# Altium PCB pwm-controller-board.PcbDoc
Units mm, origin at the board's own origin, x right, y up, seen from the top; angles counter-clockwise.
Board outline 100 x 70 mm, 2 copper layers (Top Layer, Bottom Layer), stack 1.518 mm thick; 85 components, 66 nets, 252 pads, 265 vias.
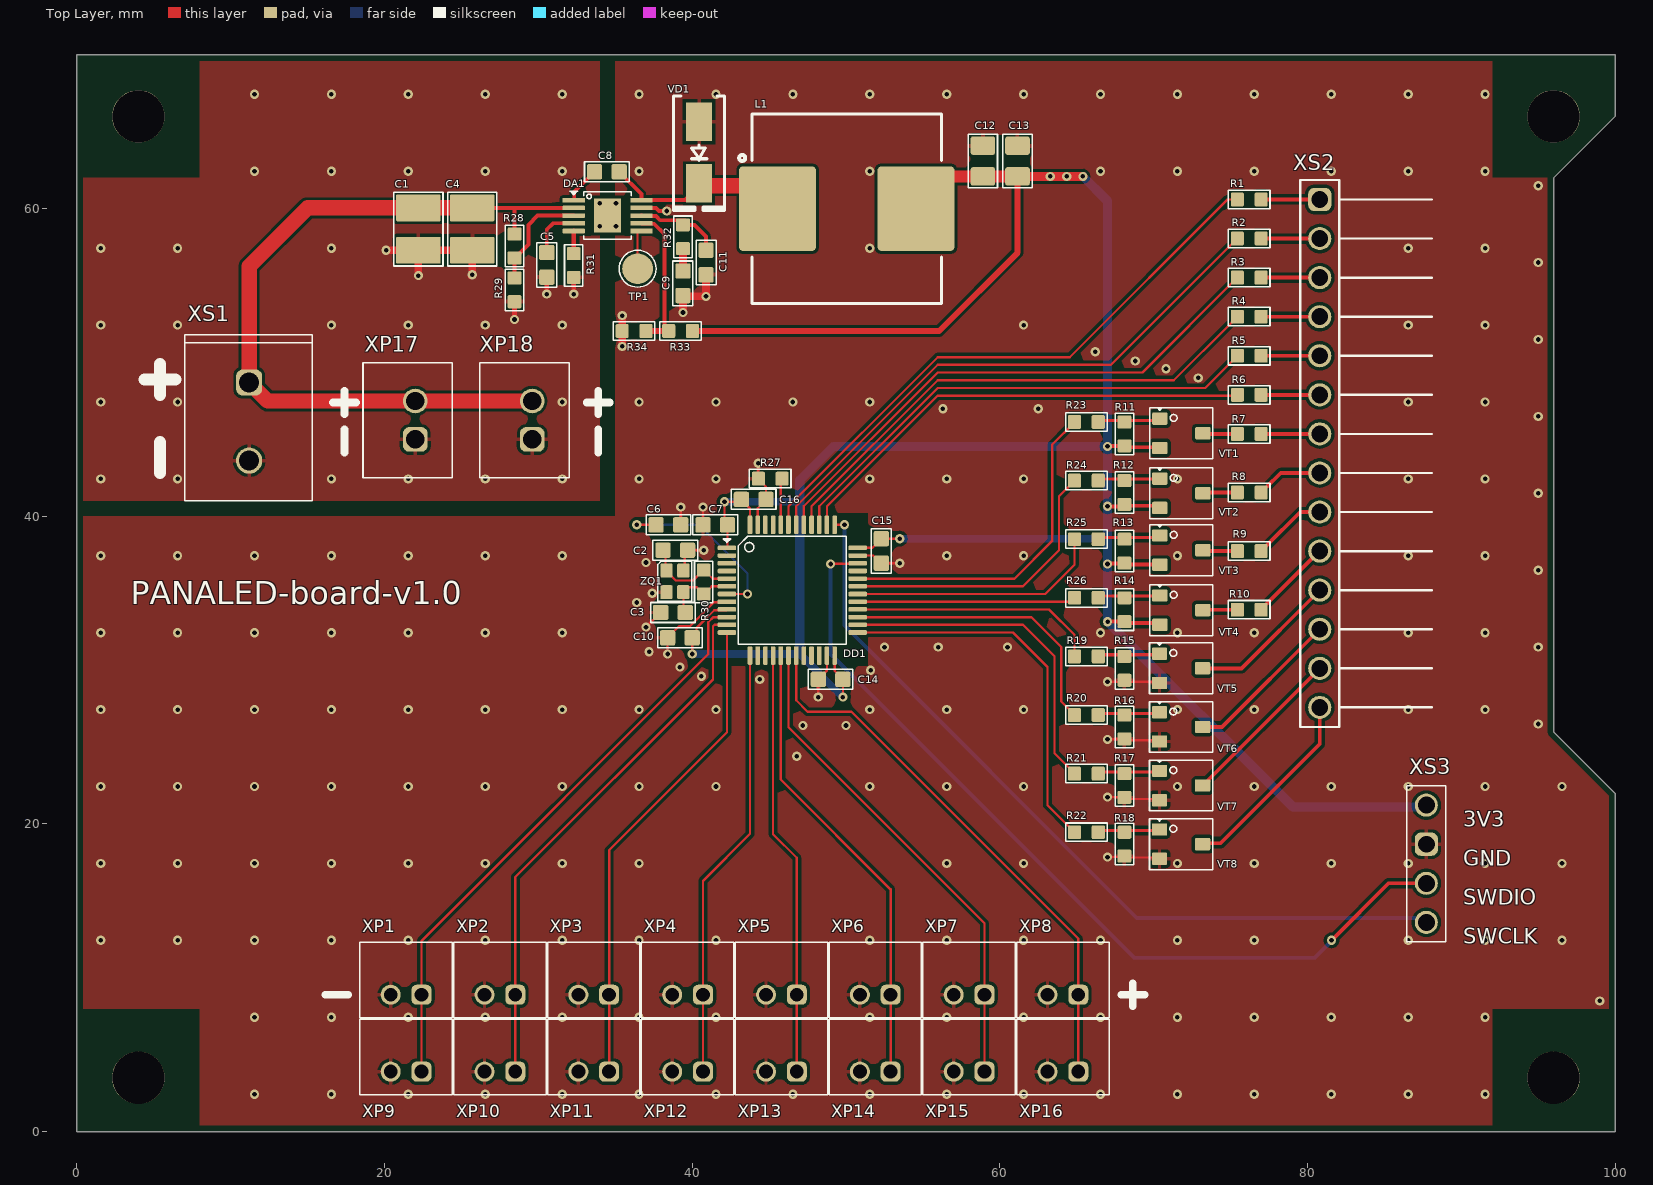
[diagram p0: Top Layer view]
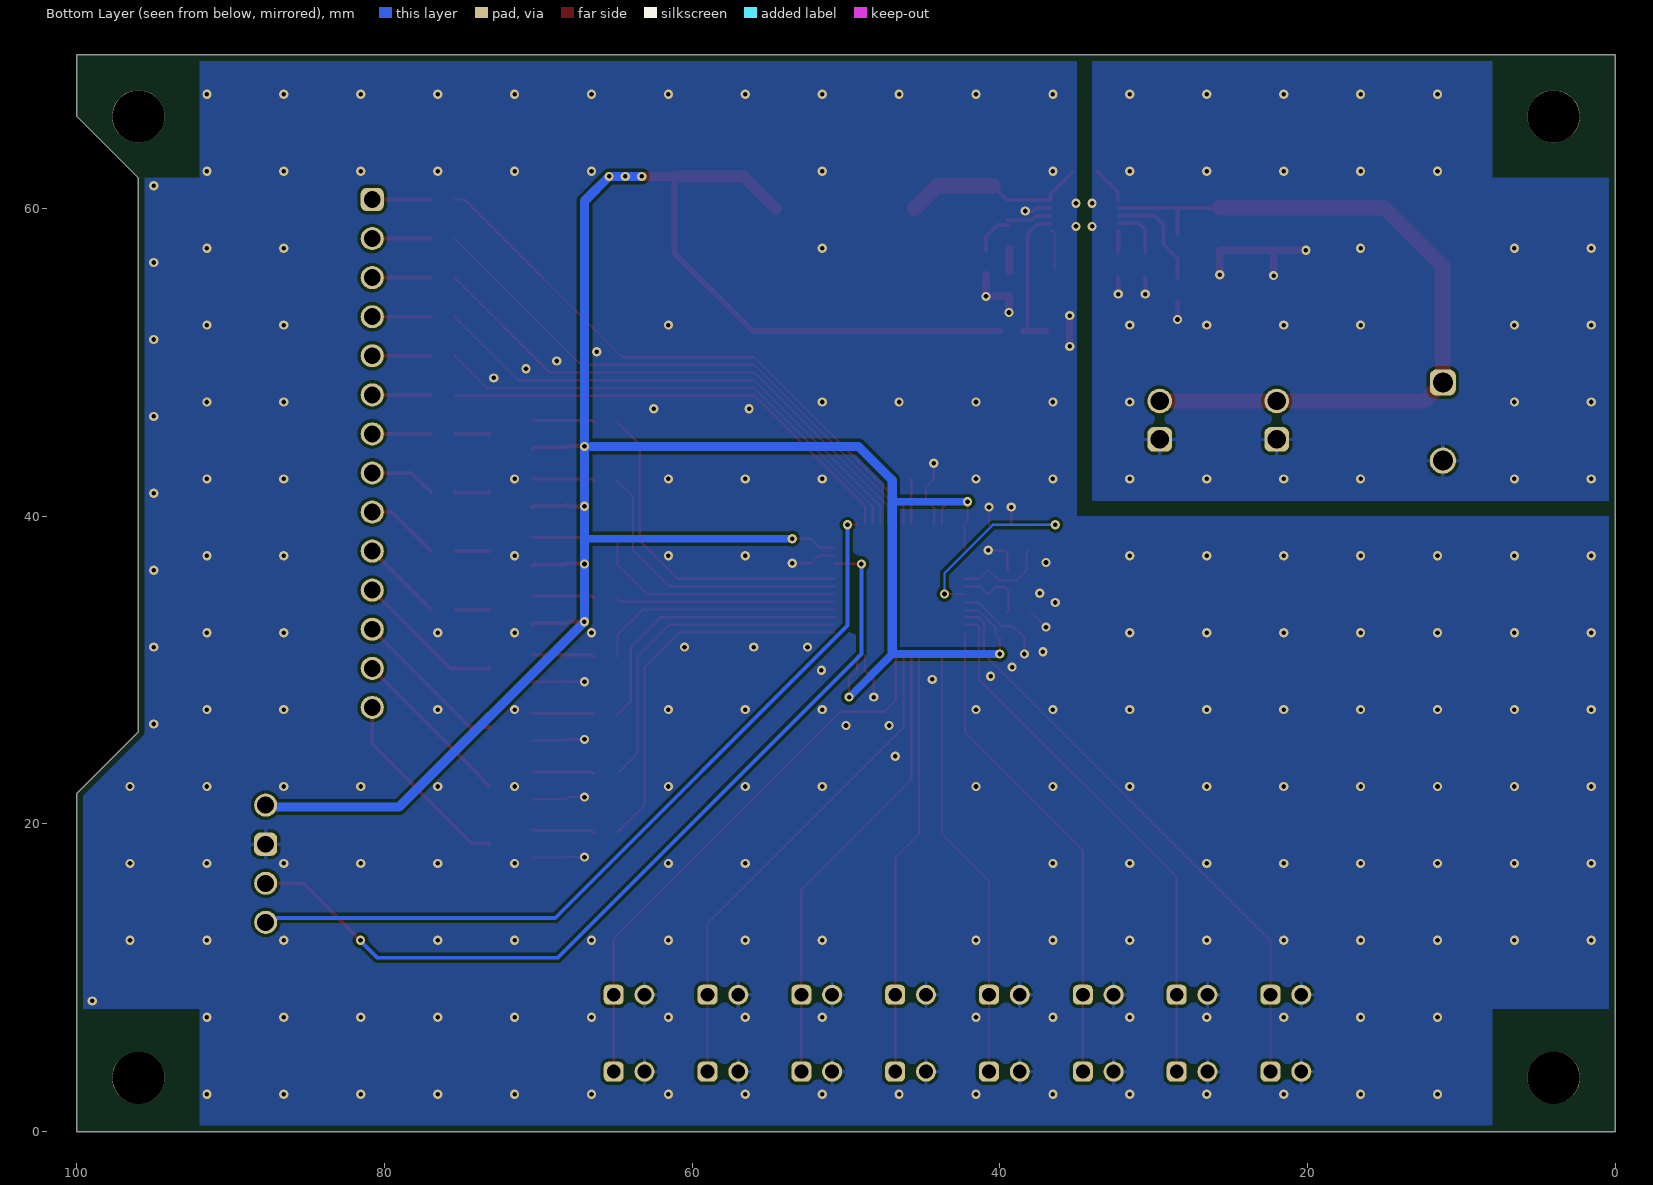
[diagram p1: Bottom Layer view, seen from below]
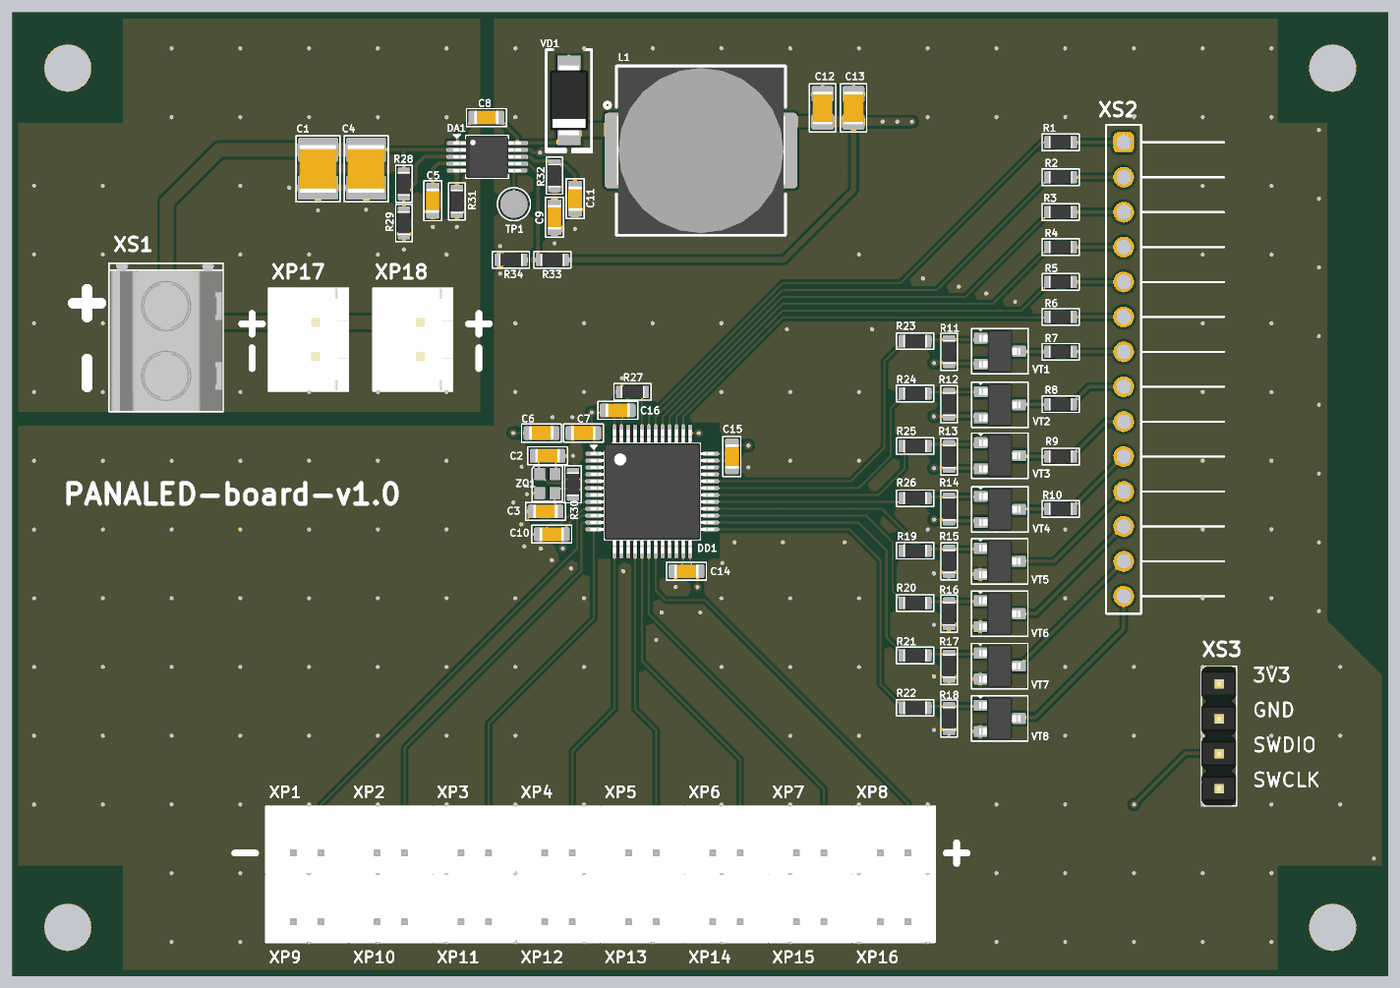
[diagram p2: 3D render of the assembled board from above, using the file's embedded part models]

## Layer stack, top to bottom
Top Solder: solder mask 0.0254, SM-001, Dk 4
Top Layer: signal copper 0.018
Dielectric 1: core 1.482, FR4 Tg135, Dk 4.5
Bottom Layer: signal copper 0.018
Bottom Solder: solder mask 0.0254, SM-001, Dk 4

## Board outline
0,0 0,70 100,70 100,66 96,62 96,26 100,22 100,0

## Design rules (kind name [scope] priority, off if disabled: settings)
AcuteAngle [All] p1: minimum=3.50000000000000E+0001 checktracksonly=FALSE
BoardOutlineClearance "BoardOutlineClearance 1" [All] p1 off: gap=0.25 ignorepadtopadclearanceinfootprint=FALSE except(0: Arc-SplitContinuation Track-SplitContinuation SMDPad-SplitContinuation THPad-SplitContinuation Via-SplitContinuation Fill-SplitContinuation Poly-SplitContinuation Region-SplitContinuation Text-SplitContinuation) // Milling
BoardOutlineClearance "BoardOutlineClearance 2" [All] p2: gap=0.4 ignorepadtopadclearanceinfootprint=FALSE except(0: Arc-SplitContinuation Track-SplitContinuation SMDPad-SplitContinuation THPad-SplitContinuation Via-SplitContinuation Fill-SplitContinuation Poly-SplitContinuation Region-SplitContinuation Text-SplitContinuation) // V-Cut
Clearance "Clearance-1 1/2 Oz" [All] p1: gap=0.125 ignorepadtopadclearanceinfootprint=FALSE except(0.2: Arc-Fill Arc-Poly Track-Fill Track-Poly SMDPad-SMDPad SMDPad-Fill SMDPad-Poly THPad-Fill THPad-Poly Via-Fill Via-Poly Fill-Fill Fill-Poly Poly-Poly Poly-Region Poly-Text; 0.25: Arc-Hole Track-Hole SMDPad-Hole THPad-Hole Via-Hole Fill-Hole Poly-Hole Region-Hole Text-Hole) // Standart
Clearance "Clearance-2 1/2 Oz" [All] p2 off: gap=0.1 ignorepadtopadclearanceinfootprint=FALSE except(0.15: Arc-Fill Arc-Poly Track-Fill Track-Poly SMDPad-SMDPad SMDPad-Fill SMDPad-Poly THPad-Fill THPad-Poly Via-Fill Via-Poly Fill-Fill Fill-Poly Poly-Poly Poly-Region Poly-Text; 0.25: Arc-Hole Track-Hole SMDPad-Hole THPad-Hole Via-Hole Fill-Hole Poly-Hole Region-Hole Text-Hole) // Advance
ComponentClearance [All] p1: gap=0.1 collisioncheckmode=3 verticalgap=0.1 showdistances=FALSE
DiffPairsRouting "DiffPairsRouting 1/2 Oz" [All] p1: maxlimit=0.254 minlimit=0.1 mostfreqgap=0.254 toplayer_minwidth=0.1 toplayer_maxwidth=0.381 toplayer_prefwidth=0.381 bottomlayer_minwidth=0.1 bottomlayer_maxwidth=0.381 bottomlayer_prefwidth=0.381 maxuncoupledlength=12.7
HoleSize "Minimum HoleSize" [IsPad] p1: absolutevalues=TRUE maxlimit=5.9 minlimit=0.6 maxpercent=80.000 minpercent=20.000
HoleSize "Minimum HoleSize VIA 1" [IsVia] p2: absolutevalues=TRUE maxlimit=5.9 minlimit=0.3 maxpercent=80.000 minpercent=20.000 // Standart
HoleSize "Minimum HoleSize VIA 2" [IsVia] p3 off: absolutevalues=TRUE maxlimit=5.9 minlimit=0.2 maxpercent=80.000 minpercent=20.000 // Advance
HoleToHoleClearance Hole2HoleClearance [All] p1: gap=0.25 allowstackedmicrovias=FALSE
MinimumAnnularRing "Minimum AR VIA Standart" [IsVia] p1: minimumring=0.15
MinimumAnnularRing "Minimum AR PAD Standart" [IsPAD] p2: minimumring=0.2
MinimumAnnularRing "Minimum AR VIA Advance" [IsVia] p3 off: minimumring=0.1
MinimumAnnularRing "Minimum AR PAD Advance" [IsPAD] p4 off: minimumring=0.15
MinimumSolderMaskSliver "SolderMask Bridge Standart" [All] p1 off: minsoldermaskwidth=0.15 // All Masks
MinimumSolderMaskSliver "SolderMask Bridge Advance" [All] p2: minsoldermaskwidth=0.1 // Mask LDI
PlaneClearance "PlaneClearance-1 1/2 Oz" [All] p1: clearance=0.2 // Standart
PlaneClearance "PlaneClearance-2 1/2 Oz" [All] p2 off: clearance=0.15 // Advance
PlaneConnect "TermalConnect-1 1/2 Oz" [All] p1: planeconnectstyle=Relief reliefexpansion=0.2 reliefentries=4 reliefconductorwidth=0.2 reliefairgap=0.2 // Standart
PlaneConnect "TermalConnect-2 1/2 Oz" [All] p2 off: pad.planeconnectstyle=Relief pad.reliefexpansion=0.15 pad.reliefentries=4 pad.reliefconductorwidth=0.15 pad.reliefairgap=0.15 via.planeconnectstyle=Direct via.reliefexpansion=0.15 via.reliefentries=4 via.reliefconductorwidth=0.15 via.reliefairgap=0.15 // Advance
PolygonConnect "PolygonConnect-1 1/2 Oz" [All] p1: thpad.connectstyle=Relief thpad.reliefconductorwidth=0.25 thpad.reliefentries=4 thpad.polygonreliefangle="90 Angle" thpad.airgapwidth=0.2 smdpad.connectstyle=Relief smdpad.reliefconductorwidth=0.25 smdpad.reliefentries=4 smdpad.polygonreliefangle="90 Angle" smdpad.airgapwidth=0.2 via.connectstyle=Direct via.reliefconductorwidth=0.254 via.reliefentries=4 via.polygonreliefangle="90 Angle" via.airgapwidth=0.254 // Standart
PolygonConnect "PolygonConnect-2 1/2 Oz" [All] p2 off: thpad.connectstyle=Relief thpad.reliefconductorwidth=0.125 thpad.reliefentries=4 thpad.polygonreliefangle="90 Angle" thpad.airgapwidth=0.15 smdpad.connectstyle=Relief smdpad.reliefconductorwidth=0.125 smdpad.reliefentries=4 smdpad.polygonreliefangle="90 Angle" smdpad.airgapwidth=0.15 via.connectstyle=Direct via.reliefconductorwidth=0.254 via.reliefentries=4 via.polygonreliefangle="90 Angle" via.airgapwidth=0.254 // Advance
RoutingCorners [All] p1 off: cornerstyle=45-Degree minsetback=2.54 maxsetback=2.54
RoutingVias [All] p1: holewidth=0.3 width=0.6 viastyle="Through Hole" minholewidth=0.2 minwidth=0.4 maxholewidth=5.9 maxwidth=6.4
SilkToSilkClearance Silk2SilkClearance [All] p1 off: silktosilkclearance=0.15
SilkToSolderMaskClearance Silk2SolderMaskClearance [IsPad] p1 off: minsilkscreentomaskgap=0.15 clearancetoexposedcopper=TRUE
SolderMaskExpansion SolderMaskExpansion-1 [All] p1: expansion=0.05 istentingtop=FALSE // Standart
SolderMaskExpansion "SolderMaskExpansion LDI" [All] p2 off: expansion=0.025 istentingtop=FALSE // Advance
UnRoutedNet [All] p1: checkbadconnections=TRUE
Width "Width 1/2 Oz" [All] p1: maxlimit=10 minlimit=0.125 preferedwidth=0.15 checkconnectedcopper=TRUE
19 further rules are at their usual default settings.

## Components (designator, comment, footprint, x,y, rotation, side; value= is the part's Value field where it differs from the comment)
C1 "2.2 µF" C_1210 22.2,58.675 r270 top
C2 "22 pF" C_0603 38.9,37.8 r180 top
C3 "22 pF" C_0603 38.75,33.75 r0 top
C4 "2.2 µF" C_1210 25.7,58.675 r270 top
C5 "0.01 µF" C_0603 30.55,56.35 r90 top
C6 "0.1 µF" C_0603 38.45,39.45 r180 top
C7 "0.1 µF" C_0603 41.5,39.45 r180 top
C8 "0.1 µF" C_0603 34.45,62.4 r180 top
C9 "4700 pF" C_0603 39.4,55.15 r90 top
C10 "0.1 µF" C_0603 39.2,32.1 r180 top
C11 "33 pF" C_0603 40.9,56.5 r270 top
C12 "47 µF" C_0805 58.9,63.1 r90 top
C13 "47 µF" C_0805 61.15,63.1 r90 top
C14 "0.1 µF" C_0603 49,29.4 r180 top
C15 "0.1 µF" C_0603 52.3,37.75 r270 top
C16 "0.1 µF" C_0603 44,41.1 r0 top
DA1 "TPS54260DGQR" DA_HVSSOP-10_DGQ 34.5,59.55 r0 top
DD1 "STM32F103C8T6" DD_LQFP-48_STM32 46.51,35.2 r0 top
L1 "10 µH" L_MSS1260 50.05,60 r0 top
R1 "470 Ω" R_0603 76.215,60.6 r180 top
R2 "470 Ω" R_0603 76.215,58.06 r180 top
R3 "470 Ω" R_0603 76.215,55.52 r180 top
R4 "470 Ω" R_0603 76.215,52.98 r180 top
R5 "470 Ω" R_0603 76.215,50.44 r180 top
R6 "470 Ω" R_0603 76.215,47.9 r180 top
R7 "20 Ω" R_0603 76.215,45.36 r180 top
R8 "20 Ω" R_0603 76.215,41.55 r180 top
R9 "20 Ω" R_0603 76.215,37.74 r180 top
R10 "20 Ω" R_0603 76.215,33.93 r180 top
R11 "10 kΩ" R_0603 68.1,45.36 r90 top
R12 "10 kΩ" R_0603 68.1,41.55 r90 top
R13 "10 kΩ" R_0603 68.1,37.74 r90 top
R14 "10 kΩ" R_0603 68.1,33.93 r90 top
R15 "10 kΩ" R_0603 68.1,30.12 r90 top
R16 "10 kΩ" R_0603 68.1,26.31 r90 top
R17 "10 kΩ" R_0603 68.1,22.5 r90 top
R18 "10 kΩ" R_0603 68.1,18.69 r90 top
R19 "100 Ω" R_0603 65.625,30.895 r180 top
R20 "100 Ω" R_0603 65.625,27.085 r180 top
R21 "100 Ω" R_0603 65.625,23.275 r180 top
R22 "100 Ω" R_0603 65.625,19.465 r180 top
R23 "100 Ω" R_0603 65.625,46.135 r180 top
R24 "100 Ω" R_0603 65.625,42.325 r180 top
R25 "100 Ω" R_0603 65.625,38.515 r180 top
R26 "100 Ω" R_0603 65.625,34.705 r180 top
R27 "10 kΩ" R_0603 45.075,42.45 r0 top
R28 "332 kΩ" R_0603 28.45,57.575 r90 top
R29 "23.2 kΩ" R_0603 28.45,54.725 r270 top
R30 "1 MΩ" R_0603 40.75,35.725 r90 top
R31 "237 kΩ" R_0603 32.3,56.3 r90 top
R32 "20 kΩ" R_0603 39.4,58.175 r90 top
R33 "31.6 kΩ" R_0603 39.25,52.05 r0 top
R34 "10 kΩ" R_0603 36.225,52.05 r0 top
TP1 "TestPoint" TP_TestPoint 36.45,56.1 r0 top
VD1 "B260A-13-F" VD_DO-214AC_SMA 40.45,63.65 r270 top
VT1 "AO3407A" VT_SOT-23 71.8,45.4 r0 top
VT2 "AO3407A" VT_SOT-23 71.8,41.5 r0 top
VT3 "AO3407A" VT_SOT-23 71.8,37.8 r0 top
VT4 "AO3407A" VT_SOT-23 71.8,33.9 r0 top
VT5 "2N7002K" VT_SOT-23 71.78,30.12 r0 top
VT6 "2N7002K" VT_SOT-23 71.78,26.31 r0 top
VT7 "2N7002K" VT_SOT-23 71.78,22.5 r0 top
VT8 "2N7002K" VT_SOT-23 71.78,18.69 r0 top
XP1 "DS1066-02M" X_DS1066_2Pin 22.4,8.9 r180 top locked
XP2 "DS1066-02M" X_DS1066_2Pin 28.5,8.9 r180 top locked
XP3 "DS1066-02M" X_DS1066_2Pin 34.6,8.9 r180 top locked
XP4 "DS1066-02M" X_DS1066_2Pin 40.7,8.9 r180 top locked
XP5 "DS1066-02M" X_DS1066_2Pin 46.8,8.9 r180 top locked
XP6 "DS1066-02M" X_DS1066_2Pin 52.9,8.9 r180 top locked
XP7 "DS1066-02M" X_DS1066_2Pin 59,8.9 r180 top locked
XP8 "DS1066-02M" X_DS1066_2Pin 65.1,8.9 r180 top locked
XP9 "DS1066-02M" X_DS1066_2Pin 22.4,3.9 r180 top locked
XP10 "DS1066-02M" X_DS1066_2Pin 28.5,3.9 r180 top locked
XP11 "DS1066-02M" X_DS1066_2Pin 34.6,3.9 r180 top locked
XP12 "DS1066-02M" X_DS1066_2Pin 40.7,3.9 r180 top locked
XP13 "DS1066-02M" X_DS1066_2Pin 46.8,3.9 r180 top locked
XP14 "DS1066-02M" X_DS1066_2Pin 52.9,3.9 r180 top locked
XP15 "DS1066-02M" X_DS1066_2Pin 59,3.9 r180 top locked
XP16 "DS1066-02M" X_DS1066_2Pin 65.1,3.9 r180 top locked
XP17 "DS1069-2 M" X_DS1069_2Pin 22,45 r90 top locked
XP18 "DS1069-2 M" X_DS1069_2Pin 29.6,45 r90 top locked
XS1 "DG127-5.08-02P-14-1000" X_DG127_2Pin_5.08mm 11.2,48.7 r270 top locked
XS2 "DS-1022-1x14R" X_DS1022_1x14R 80.8,60.6 r270 top locked
XS3 "DS-1021-1x4" X_DS1021_1x4 87.725,21.225 r270 top
ZQ1 "16 MHz" ZQ_2016_4Pin 38.35,36.45 r270 top

## Footprints (in the part's own frame and the unit in brackets; to place one, negate y for a bottom-side part, rotate by r counter-clockwise, add the part's x,y. Pads: shape width x height; smd on the part's side, far side on the other; paste and mask are expansions set on the pad)
C_0603 [mm] "Non-polarized capacitor, 0603 (1608 metric)"
  rrect25% 1x1 smd: 1(-0.8,0) 2(0.8,0)
  silkscreen extent -1.45,-0.65 1.45,0.65, body extent -0.9,-0.5 0.9,0.5, height 1
C_0805 [mm] "Non-polarized capacitor, 0805 (2012 metric)"
  rrect25% 1.2x1.6 smd: 1(-1,0) 2(1,0)
  silkscreen extent -1.75,-0.95 1.75,0.95, body extent -1.2,-0.72 1.2,0.72, height 1.45
C_1210 [mm] "Non-polarized capacitor, 1210 (3225 metric)"
  rrect10% 1.75x2.9 smd: 1(-1.375,0) 2(1.375,0)
  silkscreen extent -2.4,-1.6 2.4,1.6, body extent -1.75,-1.35 1.75,1.35, height 2.7
DA_HVSSOP-10_DGQ [mm] "HVSSOP-10 with exposed pad, TI DGQ package"
  rrect25% 1.45x0.3 smd: 1(-2.2,1) 2(-2.2,0.5) 3(-2.2,0) 4(-2.2,-0.5) 5(-2.2,-1) 6(2.2,-1) 7(2.2,-0.5) 8(2.2,0) 9(2.2,0.5) 10(2.2,1)
  rect 1.75x2.22 smd: 11(0,0)
  silkscreen extent -2.45,-1.55 1.55,1.6, body extent -2.45,-1.55 2.45,1.55, height 1.1
DD_LQFP-48_STM32 [mm] "STM32 microcontroller, LQFP-48 package"
  rrect50% 1.2x0.3 smd: 1(-4.25,2.75) 2(-4.25,2.25) 3(-4.25,1.75) 4(-4.25,1.25) 5(-4.25,0.75) 6(-4.25,0.25) 7(-4.25,-0.25) 8(-4.25,-0.75) 9(-4.25,-1.25) 10(-4.25,-1.75) 11(-4.25,-2.25) 12(-4.25,-2.75) 25(4.25,-2.75) 26(4.25,-2.25) 27(4.25,-1.75) 28(4.25,-1.25) 29(4.25,-0.75) 30(4.25,-0.25) 31(4.25,0.25) 32(4.25,0.75) 33(4.25,1.25) 34(4.25,1.75) 35(4.25,2.25) 36(4.25,2.75)
  rrect50% 0.3x1.2 smd: 13(-2.75,-4.25) 14(-2.25,-4.25) 15(-1.75,-4.25) 16(-1.25,-4.25) 17(-0.75,-4.25) 18(-0.25,-4.25) 19(0.25,-4.25) 20(0.75,-4.25) 21(1.25,-4.25) 22(1.75,-4.25) 23(2.25,-4.25) 24(2.75,-4.25) 37(2.75,4.25) 38(2.25,4.25) 39(1.75,4.25) 40(1.25,4.25) 41(0.75,4.25) 42(0.25,4.25) 43(-0.25,4.25) 44(-0.75,4.25) 45(-1.25,4.25) 46(-1.75,4.25) 47(-2.25,4.25) 48(-2.75,4.25)
  silkscreen extent -4.5,-3.5 3.5,3.5, body extent -4.5,-4.5 4.5,4.5, height 1.6
L_MSS1260 [mm] "Shielded power inductor, Coilcraft MSS1260 series"
  rrect10% 5x5.5 smd: 1(-4.5,0) 2(4.5,0)
  silkscreen extent -7,-6.15 6.15,6.15, body extent -6.1,-6 6.1,6, height 6.3
R_0603 [mm] "Fixed resistor, 0603 (1608 metric)"
  rrect20% 0.85x0.9 smd: 1(-0.775,0) 2(0.775,0)
  silkscreen extent -1.35,-0.6 1.35,0.6, body extent -0.85,-0.45 0.85,0.45, height 0.55
TP_TestPoint [mm] "PCB test point"
  round 2 smd: 1(0,0)
  silkscreen extent -1.2,-1.2 1.2,1.2
VD_DO-214AC_SMA [mm] "Schottky diode, DO-214AC (SMA); pin 1 anode, pin 2 cathode"
  rect 2.5x1.7 smd: 1(-2,0) 2(2,0)
  silkscreen extent -3.68,-1.65 3.75,1.65, body extent -2.6,-1.37 2.6,1.37, height 2.4
VT_SOT-23 [mm] "MOSFET, SOT-23; pins G gate, S source, D drain"
  rrect20% 1x0.8 smd: D(1.4,0) G(-1.4,0.95) S(-1.4,-0.95)
  silkscreen extent -2.05,-1.65 2.05,1.65, body extent -1.5,-1.55 1.5,1.55, height 1.25
X_DG127_2Pin_5.08mm [mm] "2-pin screw terminal block, Degson DG127, 5.08 mm pitch"
  rrect50% 1.7x1.7 hole 1.3: 1(0,0)
  round 1.7 hole 1.3: 2(5.08,0)
  silkscreen extent -3.1,-4.2 7.7,4.1, body extent -3.03,-4.1 7.63,4, height 10.01
X_DS1021_1x4 [mm] "4-pin straight header, Connfly DS-1021-1x4"
  round 1.5 hole 1.1: 1(0,0) 3(5.08,0) 4(7.62,0)
  rrect50% 1.5x1.5 hole 1.1: 2(2.54,0)
  silkscreen extent -1.27,-1.27 8.89,1.27, body extent -1.27,-1.27 8.89,1.27, height 9.21
X_DS1022_1x14R [mm] "14-pin right-angle header, Connfly DS1022-1x14R"
  rrect50% 1.5x1.5 hole 1.1: 1(0,0)
  round 1.5 hole 1.1: 2(2.54,0) 3(5.08,0) 4(7.62,0) 5(10.16,0) 6(12.7,0) 7(15.24,0) 8(17.78,0) 9(20.32,0) 10(22.86,0) 11(25.4,0) 12(27.94,0) 13(30.48,0) 14(33.02,0)
  silkscreen extent -1.27,-1.27 34.29,7.3, body extent -1.27,-1.27 34.29,7.35, height 5.46
X_DS1066_2Pin [mm] "2-pin connector, Connfly DS1066-02M"
  rrect50% 1.3x1.3 hole 0.9: 1(0,0)
  round 1.3 hole 0.9: 2(2,0)
  silkscreen extent -2,-3.4 4,1.5, body extent -1.95,-3.35 3.95,1.45, height 6.21
X_DS1069_2Pin [mm] "2-pin connector, Connfly DS1069-2 M"
  rrect50% 1.6x1.6 hole 1.2: 1(0,0)
  round 1.6 hole 1.2: 2(2.5,0)
  silkscreen extent -2.5,-2.4 5,3.4, body extent -2.45,-2.38 4.95,3.37, height 7.01
ZQ_2016_4Pin [mm] "Quartz crystal, CTS 402W, 2.0 x 1.6 mm; pins 1/3 crystal, 2/4 case"
  rrect20% 0.9x0.8 smd: 1(-0.025,-0.025) 2(1.375,-0.025) 3(1.375,1.075) 4(-0.025,1.075)
  silkscreen extent -0.63,-0.58 1.97,1.63, body extent -0.33,-0.28 1.68,1.33, height 0.46

## Part data
C1 C4: library part C_NonPolarized, "Non-polarized capacitor", Case=1210, Case Type=SMD, Manufacturer=Yageo, Part Number=CC1210KKX7R0BB225
C2 C3: library part C_NonPolarized, "Non-polarized capacitor", Case=0603, Case Type=SMD, Manufacturer=Murata, Part Number=GRM1885C1H220JA01D
C5: library part C_NonPolarized, "Non-polarized capacitor", Case=0603, Case Type=SMD, Manufacturer=Murata, Part Number=GRM1885C1H103JA01D
C6 C7 C8 C10 C14 C15 C16: library part C_NonPolarized, "Non-polarized capacitor", Case=0603, Case Type=SMD, Manufacturer=Murata, Part Number=GRM188R72A104KA35D
C9: library part C_NonPolarized, "Non-polarized capacitor", Case=0603, Case Type=SMD, Manufacturer=Murata, Part Number=GRM1885C1H472JA01D
C11: library part C_NonPolarized, "Non-polarized capacitor", Case=0603, Case Type=SMD, Manufacturer=Murata, Part Number=GRM1885C1H330JA01D
C12 C13: library part C_NonPolarized, "Non-polarized capacitor", Case=0805, Case Type=SMD, Manufacturer=Murata, Part Number=GRM21BR61A476ME15L
DA1: library part DA_TPS54260, "TPS54260 step-down switching regulator, HVSSOP-10", Case="HVSSOP (DGQ) [] 10", Case Type=SMD, Manufacturer=TI, Part Number=TPS54260DGQR
DD1: library part DD_STM32_LQFP48, "STM32 microcontroller, LQFP-48 package", Case=LQFP48, Case Type=SMD, Manufacturer=ST, Part Number=STM32F103C8T6
L1: library part L_Inductor, "Inductor", Case="12.00mm x 12.00mm", Case Type=SMD, Manufacturer=Coilcraft, Part Number=MSS1260-103MLD
R1 R2 R3 R4 R5 R6: library part R_Resistor, "Fixed resistor", Case=0603, Case Type=SMD, Manufacturer=Yageo, Part Number=RC0603FR-07470RL
R7 R8 R9 R10: library part R_Resistor, "Fixed resistor", Case=0603, Case Type=SMD, Manufacturer=Yageo, Part Number=RC0603FR-0720RL
R11 R12 R13 R14 R15 R16 R17 R18 R27 R34: library part R_Resistor, "Fixed resistor", Case=0603, Case Type=SMD, Manufacturer=Yageo, Part Number=RC0603FR-0710KL
R19 R20 R21 R22 R23 R24 R25 R26: library part R_Resistor, "Fixed resistor", Case=0603, Case Type=SMD, Manufacturer=Yageo, Part Number=RC0603FR-07100RL
R28: library part R_Resistor, "Fixed resistor", Case=0603, Case Type=SMD, Manufacturer=Yageo, Part Number=RC0603FR-07332KL
R29: library part R_Resistor, "Fixed resistor", Case=0603, Case Type=SMD, Manufacturer=Yageo, Part Number=RC0603FR-0723K2L
R30: library part R_Resistor, "Fixed resistor", Case=0603, Case Type=SMD, Manufacturer=Yageo, Part Number=RC0603FR-071ML
R31: library part R_Resistor, "Fixed resistor", Case=0603, Case Type=SMD, Manufacturer=Yageo, Part Number=RC0603FR-07237KL
R32: library part R_Resistor, "Fixed resistor", Case=0603, Case Type=SMD, Manufacturer=Yageo, Part Number=RC0603FR-0720KL
R33: library part R_Resistor, "Fixed resistor", Case=0603, Case Type=SMD, Manufacturer=Yageo, Part Number=RC0603FR-0731K6L
TP1: library part TP_TestPoint, "Test point"
VD1: library part VD_Schottky, "Schottky diode; pin 1 anode, pin 2 cathode", Case="DO-214AC, SMA", Case Type=SMD, Manufacturer="Diodes Incorporated", Part Number=B260A-13-F
VT1 VT2 VT3 VT4: library part VT_MOSFET-P, "P-channel MOSFET; pins G gate, S source, D drain", Case=SOT-23-3, Case Type=SMD, Manufacturer=Youtai, Part Number=AO3407A
VT5 VT6 VT7 VT8: library part VT_MOSFET-N, "N-channel MOSFET; pins G gate, S source, D drain", Case="SOT-23 (TO-236AB)", Case Type=SMD, Manufacturer=Hottech, Part Number=2N7002K
XP1 XP2 XP3 XP4 XP5 XP6 XP7 XP8 XP9 XP10 XP11 XP12 XP13 XP14 XP15 XP16: library part XP_Connector_2Pin_DS1066, "2-pin connector, DS1066 series", Case="5.8 x 4.8", Case Type=THT, Manufacturer=Connfly, Part Number=DS1066-02M
XP17 XP18: library part XP_Connector_2Pin_DS1069, "2-pin connector, DS1069 series", Case="7.5 x 5.75", Case Type=THT, Manufacturer=Connfly, Part Number="DS1069-2 M"
XS1: library part XS_TerminalBlock_2Pin, "2-pin screw terminal block", Case="10.8 x 8.2", Case Type=THT, Manufacturer=Degson, Part Number=DG127-5.08-02P-14-1000
XS2: library part XS_Connector_14Pin, "14-pin connector", Case=PLS-14R, Case Type=THT, Manufacturer=Connfly, Part Number=DS-1022-1x14R
XS3: library part XS_Connector_4Pin, "4-pin connector", Case=PLS-4, Case Type=THT, Manufacturer=Connfly, Part Number=DS-1021-1x4
ZQ1: library part ZQ_Crystal, "Quartz crystal; pins 1/3 crystal, 2/4 metal case", Case="2.0 x 1.6 mm", Case Type=SMD, Manufacturer=CTS, Part Number=402WF16012ILR

## Free pads (board coordinates)
  round 3.4 hole 3.4: MH(4,3.5) MH(4,66) MH(96,3.5) MH(96,66)

## Via types
v1: diameter 0.6, hole 0.3, Top Layer to Bottom Layer, tented both sides, 265 vias

## Nets (pads, with @x,y where several pads share a name; then routed paths per layer and width w, separated by ;. In a path a pad name is that pad's centre, name@x,y a point inside that pad or via, vN(x,y) a via of type N, cw(c..) or ccw(c..) an arc to the next point about the centre after c; other vN are vias at no path point)
+3,3V: C7.1 C10.1 C12.1 C13.1 C14.1 C15.1 C16.1 DD1.1 DD1.9 DD1.24 DD1.36 DD1.48 L1.2 R11.1 R12.1 R13.1 R14.1 R33.2 VT1.S VT2.S VT3.S VT4.S XS3.1 | length 189.3
  Top Layer w0.15: v1(40,31.05) C10.1 40.276,32.376 40.276,32.737 41.435,33.896 42.206,33.896 DD1.9 ; DD1.1 42.3,37.99 C7.1 42.1,39.65 v1(42.1,40.95) 43.05,40.95 C16.1 43.2,41.073 43.76,40.513 DD1.48 ; DD1.24 49.26,29.967 49.8,29.427 C14.1 v1(49.8,28.25) v1@49.8,28.15 ; DD1.36 51.7,37.95 C15.1 v1(53.5,38.55)
  Top Layer w0.25: v1(67,36.9) 67.032,36.932 68.067,36.932 R13.1 68.188,36.878 70.293,36.878 VT3.S@70.38,36.79 ; v1(67,40.65) 67.975,40.65 R12.1 68.188,40.688 70.293,40.688 VT2.S@70.38,40.6 ; v1(67,44.55) 67.018,44.568 68.047,44.568 68.065,44.55 R11.1 68.188,44.498 70.293,44.498 VT1.S@70.38,44.41 ; v1(67.005,33.155) R14.1 68.187,33.068 70.293,33.068 VT4.S@70.38,32.98
  Top Layer w0.4: R33.2 56.05,52.05 61.15,57.15 C13.1
  Top Layer w0.6: C13.1 v1(63.275,62.1) v1(64.35,62.1) v1(65.4,62.1)
  Top Layer w0.8: L1.2 56.65,62.1 C12.1 C13.1
  Bottom Layer w0.5: v1(40,31.05) 47,31.05 v1(49.8,28.25) ; v1(42.1,40.95) 47,40.95 ; v1(53.5,38.55) 67,38.55
  Bottom Layer w0.6: 47,31.05 47,40.95 47,42.35 49.2,44.55 v1(67,44.55) ; v1(63.275,62.1) v1(64.35,62.1) v1(65.4,62.1) 67,60.5 v1(67,44.55) ; XS3.1@87.725,21.1 79.06,21.1 v1(67.005,33.155) 67,33.16 v1(67,36.9) 67,38.55 v1(67,40.65) v1(67,44.55)
+24V: C1.1 C4.1 DA1.2 R28.2 XP17.2 XP18.2 XS1.1 | length 50.8
  Top Layer w0.25: C4.1 28.45,60.05 ; R28.2 28.45,60.05 ; DA1.2 28.45,60.05
  Top Layer w1: C4.1 C1.1 15,60.05 11.2,56.25 XS1.1 12.4,47.5 XP17.2 XP18.2
GND: C1.2 C2.1 C3.1 C4.2 C5.1 C6.1 C7.2 C9.1 C10.2 C11.2 C12.2 C13.2 C14.2 C15.2 C16.2 DA1.9 DA1.11 DD1.8 DD1.23 DD1.35 DD1.47 R15.1 R16.1 R17.1 R18.1 R27.1 R29.2 R31.1 R34.1 VD1.1 VT5.S VT6.S VT7.S VT8.S XP1.2 XP2.2 XP3.2 XP4.2 XP5.2 XP6.2 XP7.2 XP8.2 XP9.2 XP10.2 XP11.2 XP12.2 XP13.2 XP14.2 XP15.2 XP16.2 XP17.1 XP18.1 XS1.2 XS3.2 ZQ1.2 ZQ1.4 | length 56.5
  Top Layer w0.15: v1(37,32.8) C3.1 ; v1@38.4,30.85 C10.2 39.15,32.85 39.86,32.85 40.25,33.24 40.25,33.25 41.425,34.425 42.235,34.425 DD1.8 ; C6.1 v1@39.25,40.65 ; ZQ1.4@39.4,36.45 39.512,36.562 39.512,37.612 C2.1 v1(40.75,37.8) ; C7.2 v1(40.7,40.6) ; DD1.47 44.26,40.533 44.8,41.073 C16.2 44.8,41.92 44.3,42.42 R27.1 v1(44.3,43.45) ; v1(48.2,28.25) C14.2 48.2,29.427 48.76,29.987 DD1.23 ; DD1.35 51.773,37.45 52.273,36.95 C15.2 v1@53.45,36.95 ; v1(67,17.85) 68.035,17.85 R18.1 68.197,17.818 70.303,17.818 VT8.S ; v1(67,21.75) 68.075,21.75 68.197,21.628 70.303,21.628 VT7.S ; v1(67,25.5) 68.065,25.5 R16.1 68.197,25.438 70.303,25.438 VT6.S ; v1(67,29.25) 68.005,29.25 R15.1 68.197,29.248 70.303,29.248 VT5.S
  Top Layer w0.25: DA1.9 37.65,60.05 37.85,59.85 v1(38.35,59.85)
  Top Layer w0.3: v1(28.45,52.8) R29.2 ; v1(30.55,54.45) C5.1 ; v1@32.3,54.4 R31.1
  Top Layer w0.5: v1(20.1,57.3) C1.2 ; v1(22.2,55.65) C1.2 ; v1@25.65,55.65 v1(25.7,55.7) C4.2 C1.2 ; v1(35.45,51.05) R34.1 v1(35.45,53.05) ; v1(39.4,53.25) C9.1 39.45,54.3 v1(40.9,54.3) C11.2
  other v1: 11.547,2.436 16.547,2.436 21.547,2.436 26.547,2.436 31.547,2.436 36.547,2.436 41.547,2.436 46.547,2.436 51.547,2.436 56.547,2.436 61.547,2.436 66.547,2.436 71.547,2.436 76.547,2.436 81.547,2.436 86.547,2.436 91.547,2.436 11.547,7.436 16.547,7.436 21.547,7.436 26.547,7.436 31.547,7.436 36.547,7.436 41.547,7.436 51.547,7.436 56.547,7.436 61.547,7.436 66.547,7.436 71.547,7.436 76.547,7.436 81.547,7.436 86.547,7.436 91.547,7.436 99,8.5 1.547,12.436 6.547,12.436 11.547,12.436 16.547,12.436 21.547,12.436 26.547,12.436 31.547,12.436 36.547,12.436 41.547,12.436 51.547,12.436 56.547,12.436 61.547,12.436 66.547,12.436 71.547,12.436 76.547,12.436 86.547,12.436 91.547,12.436 96.547,12.436 1.547,17.436 6.547,17.436 11.547,17.436 16.547,17.436 21.547,17.436 26.547,17.436 31.547,17.436 36.547,17.436 56.547,17.436 61.547,17.436 71.547,17.436 76.547,17.436 81.547,17.436 86.547,17.436 91.547,17.436 96.547,17.436 1.547,22.436 6.547,22.436 11.547,22.436 16.547,22.436 21.547,22.436 26.547,22.436 31.547,22.436 36.547,22.436 41.547,22.436 51.547,22.436 56.547,22.436 61.547,22.436 71.547,22.436 76.547,22.436 81.547,22.436 86.547,22.436 91.547,22.436 96.547,22.436 46.8,24.4 47.2,26.4 50,26.4 95,26.5 1.547,27.436 6.547,27.436 11.547,27.436 16.547,27.436 21.547,27.436 26.547,27.436 31.547,27.436 36.547,27.436 41.547,27.436 51.547,27.436 56.547,27.436 61.547,27.436 71.547,27.436 76.547,27.436 86.547,27.436 91.547,27.436 44.4,29.4 40.6,29.6 51.6,30 39.2,30.2 38.4,31.05 37.2,31.2 52.5,31.5 56,31.5 60.5,31.5 95,31.5 1.547,32.436 6.547,32.436 11.547,32.436 16.547,32.436 21.547,32.436 26.547,32.436 31.547,32.436 66.547,32.436 71.547,32.436 76.547,32.436 86.547,32.436 91.547,32.436 36.4,34.4 37.4,35 95,36.5 53.5,36.95 37,37 1.547,37.436 6.547,37.436 11.547,37.436 16.547,37.436 21.547,37.436 26.547,37.436 31.547,37.436 56.547,37.436 61.547,37.436 71.547,37.436 86.547,37.436 91.547,37.436 39.25,40.6 95,41.5 1.547,42.436 6.547,42.436 16.547,42.436 21.547,42.436 26.547,42.436 31.547,42.436 36.547,42.436 41.547,42.436 51.547,42.436 56.547,42.436 61.547,42.436 71.547,42.436 86.547,42.436 91.547,42.436 95,46.5 56.3,47 62.5,47 1.547,47.436 6.547,47.436 31.547,47.436 36.547,47.436 41.547,47.436 46.547,47.436 51.547,47.436 86.547,47.436 91.547,47.436 72.9,49 70.8,49.6 68.8,50.1 66.2,50.7 95,51.5 1.547,52.436 6.547,52.436 16.547,52.436 21.547,52.436 26.547,52.436 31.547,52.436 61.547,52.436 86.547,52.436 91.547,52.436 32.3,54.45 95,56.5 1.547,57.436 6.547,57.436 16.547,57.436 51.547,57.436 86.547,57.436 91.547,57.436 34,58.85 35.05,58.85 34,60.35 35.05,60.35 95,61.5 11.547,62.436 16.547,62.436 21.547,62.436 26.547,62.436 31.547,62.436 36.547,62.436 51.547,62.436 66.547,62.436 71.547,62.436 76.547,62.436 81.547,62.436 86.547,62.436 91.547,62.436 11.547,67.436 16.547,67.436 21.547,67.436 26.547,67.436 31.547,67.436 36.547,67.436 41.547,67.436 46.547,67.436 51.547,67.436 56.547,67.436 61.547,67.436 66.547,67.436 71.547,67.436 76.547,67.436 81.547,67.436 86.547,67.436 91.547,67.436
KEY_COL_1: DD1.43 R1.2 | length 38.6
  Top Layer w0.15: DD1.43 46.26,40.65 55.96,50.35 64.55,50.35 74.8,60.6 R1.2
KEY_COL_2: DD1.42 R2.2 | length 37.1
  Top Layer w0.15: DD1.42 46.76,40.65 55.96,49.85 67.23,49.85 R2.2
KEY_COL_3: DD1.41 R3.2 | length 35.5
  Top Layer w0.15: DD1.41 47.26,40.65 55.96,49.35 69.27,49.35 R3.2
KEY_ROW_1: DD1.40 R4.2 | length 34
  Top Layer w0.15: DD1.40 47.76,40.65 55.96,48.85 71.31,48.85 75.071,52.611 75.091,52.611 75.44,52.96 R4.2
KEY_ROW_2: DD1.39 R5.2 | length 32.4
  Top Layer w0.15: DD1.39 48.26,40.65 55.96,48.35 73.35,48.35 75.071,50.071 75.091,50.071 75.44,50.42 R5.2
KEY_ROW_3: DD1.38 R6.2 | length 30.9
  Top Layer w0.15: DD1.38 48.76,40.65 55.96,47.85 75.39,47.85 R6.2
LED_COL_1: DD1.32 R23.2 | length 22
  Top Layer w0.15: DD1.32 60.95,35.95 63.4,38.4 63.4,44.66 64.85,46.11 R23.2
LED_COL_2: DD1.31 R24.2 | length 19
  Top Layer w0.15: DD1.31 61.5,35.45 63.85,37.8 63.85,41.3 64.85,42.3 R24.2
LED_COL_3: DD1.30 R25.2 | length 16.5
  Top Layer w0.15: DD1.30 62.95,34.95 64.85,36.85 R25.2
LED_COL_4: DD1.29 R26.2 | length 14.2
  Top Layer w0.15: DD1.29 64.595,34.45 R26.2
LED_ROW_1: DD1.28 R19.2 | length 16.2
  Top Layer w0.15: DD1.28 63.2,33.95 64.85,32.3 R19.2
LED_ROW_2: DD1.27 R20.2 | length 18.8
  Top Layer w0.15: DD1.27 62.05,33.45 64,31.5 64,27.96 64.85,27.11 R20.2
LED_ROW_3: DD1.26 R21.2 | length 21.8
  Top Layer w0.15: DD1.26 61.5,32.95 63.55,30.9 63.55,24.6 64.85,23.3 R21.2
LED_ROW_4: DD1.25 R22.2 | length 24.7
  Top Layer w0.15: DD1.25 60.85,32.45 63.1,30.2 63.1,21.215 64.481,19.834 64.501,19.834 64.85,19.485 R22.2
NetC2_2: C2.2 DD1.5 R30.2 ZQ1.1 | length 6.2
  Top Layer w0.15: C2.2 38.263,37.637 38.263,36.537 38.35,36.45 38.35,36.4 38.925,35.825 40.05,35.825 40.725,36.5 R30.2 40.78,36.5 41.33,35.95 DD1.5
NetC3_2: C3.2 DD1.6 R30.1 ZQ1.3 | length 4.8
  Top Layer w0.15: C3.2 39.438,33.863 39.438,35.063 39.4,35.1 39.7,35.4 40.287,35.4 40.381,35.306 40.381,35.299 40.73,34.95 40.78,34.95 41.28,35.45 DD1.6
NetC5_2: C5.2 DA1.4 | length 3.4
  Top Layer w0.25: C5.2 30.55,58.65 30.95,59.05 DA1.4
NetC6_2: C6.2 DD1.7 | length 12.4
  Top Layer w0.15: v1(36.4,39.45) C6.2 ; DD1.7 v1(43.6,34.95)
  Bottom Layer w0.15: v1(36.4,39.45) 40.45,39.45 43.6,36.3 v1(43.6,34.95)
NetC8_1: C8.1 DA1.10 L1.1 VD1.2 | length 12.3
  Top Layer w0.25: C8.1 36.7,60.95 DA1.10 36.725,60.575 39.525,60.575 VD1.2@40.45,61.5
  Top Layer w1: VD1.2@40.45,61.5 44.05,61.5 L1.1
NetC8_2: C8.2 DA1.1 | length 2.4
  Top Layer w0.25: DA1.1 32.304,60.55 32.329,60.575 32.329,61.079 C8.2
NetC9_2: C9.2 R32.1 | length 1.5
  Top Layer w0.5: C9.2 R32.1
NetC11_1: C11.1 DA1.8 R32.2 | length 5.7
  Top Layer w0.25: DA1.8 36.725,59.525 37.645,59.525 37.92,59.25 R32.2@39.55,59.25 ; R32.2 40.15,58.95 40.9,58.2 C11.1
NetDA1_3: DA1.3 R28.1 R29.1 | length 7
  Top Layer w0.25: R29.1 R28.1 ; R28.1@28.475,56.8 29.35,57.675 29.35,58.95 29.95,59.55 DA1.3
NetDA1_5: DA1.5 R31.2 | length 1.3
  Top Layer w0.3: R31.2@32.3,57.225 DA1.5
NetDA1_6: DA1.6 TP1.1 | length 2.7
  Top Layer w0.15: TP1.1 36.45,58.475 36.525,58.55 DA1.6
NetDA1_7: DA1.7 R33.1 R34.2 | length 9.7
  Top Layer w0.25: DA1.7 36.725,59.025 37.525,59.025 38.2,58.35 38.2,52.325 R33.1
  Top Layer w0.4: R34.2 R33.1
NetDD1_44: DD1.44 R27.2 | length 3
  Top Layer w0.15: DD1.44 45.76,42.36 R27.2
NetR1_1: R1.1 XS2.1 | length 3.8
  Top Layer w0.25: R1.1 XS2.1
NetR2_1: R2.1 XS2.2 | length 3.8
  Top Layer w0.25: R2.1 XS2.2
NetR3_1: R3.1 XS2.3 | length 3.8
  Top Layer w0.25: R3.1 XS2.3
NetR4_1: R4.1 XS2.4 | length 3.8
  Top Layer w0.25: R4.1 XS2.4
NetR5_1: R5.1 XS2.5 | length 3.8
  Top Layer w0.25: R5.1 XS2.5
NetR6_1: R6.1 XS2.6 | length 3.8
  Top Layer w0.25: R6.1 XS2.6
NetR7_1: R7.1 XS2.7 | length 3.8
  Top Layer w0.25: R7.1 XS2.7
NetR7_2: R7.2 VT1.D | length 2.3
  Top Layer w0.25: VT1.D@73.18,45.36 R7.2
NetR8_1: R8.1 XS2.8 | length 4.4
  Top Layer w0.25: R8.1 76.99,41.575 77.29,41.875 77.315,41.875 78.26,42.82 XS2.8
NetR8_2: R8.2 VT2.D | length 2.3
  Top Layer w0.25: VT2.D@73.18,41.55 R8.2
NetR9_1: R9.1 XS2.9 | length 4.9
  Top Layer w0.25: R9.1 76.99,37.765 77.29,38.065 77.315,38.065 79.53,40.28 XS2.9
NetR9_2: R9.2 VT3.D | length 2.3
  Top Layer w0.25: VT3.D@73.18,37.74 R9.2
NetR10_1: R10.1 XS2.10 | length 5.4
  Top Layer w0.25: R10.1 76.99,33.955 80.775,37.74 XS2.10
NetR10_2: R10.2 VT4.D | length 2.3
  Top Layer w0.25: VT4.D@73.18,33.93 R10.2
NetR11_2: R11.2 R23.1 VT1.G | length 4.1
  Top Layer w0.2: R23.1 66.51,46.245 70.315,46.245 VT1.G@70.38,46.31
NetR12_2: R12.2 R24.1 VT2.G | length 4.1
  Top Layer w0.2: R24.1 66.51,42.435 70.315,42.435 VT2.G@70.38,42.5
NetR13_2: R13.2 R25.1 VT3.G | length 4.1
  Top Layer w0.2: R25.1 66.51,38.625 70.315,38.625 VT3.G@70.38,38.69
NetR14_2: R14.2 R26.1 VT4.G | length 4.1
  Top Layer w0.2: R26.1 66.51,34.815 70.315,34.815 VT4.G@70.38,34.88
NetR15_2: R15.2 R19.1 VT5.G | length 4.1
  Top Layer w0.2: R19.1 66.51,31.005 70.315,31.005 VT5.G
NetR16_2: R16.2 R20.1 VT6.G | length 4.1
  Top Layer w0.2: R20.1 66.51,27.195 70.315,27.195 VT6.G
NetR17_2: R17.2 R21.1 VT7.G | length 4.1
  Top Layer w0.2: R21.1 66.51,23.385 70.315,23.385 VT7.G
NetR18_2: R18.2 R22.1 VT8.G | length 4.1
  Top Layer w0.2: R22.1 66.51,19.575 70.315,19.575 VT8.G
NetVT5_D: VT5.D XS2.11 | length 9.7
  Top Layer w0.25: VT5.D 75.72,30.12 XS2.11
NetVT6_D: VT6.D XS2.12 | length 10.3
  Top Layer w0.25: VT6.D 74.45,26.31 XS2.12
NetVT7_D: VT7.D XS2.13 | length 10.8
  Top Layer w0.25: VT7.D 73.28,22.5 73.555,22.775 73.555,22.875 XS2.13
NetVT8_D: VT8.D XS2.14 | length 12.7
  Top Layer w0.25: VT8.D 73.24,18.75 74.35,18.75 80.8,25.2 XS2.14
PWM1: DD1.10 XP1.1 XP9.1 | length 38.3
  Top Layer w0.15: XP9.1 XP1.1 22.4,12.4 41.05,31.05 41.05,33.122 41.378,33.45 DD1.10
PWM2: DD1.11 XP2.1 XP10.1 | length 35.2
  Top Layer w0.15: XP10.1 XP2.1 28.5,16.55 41.35,29.4 41.35,32.85 41.45,32.95 DD1.11
PWM3: DD1.12 XP3.1 XP11.1 | length 31.7
  Top Layer w0.15: XP11.1 XP3.1 34.6,18.3 42.26,25.96 DD1.12
PWM4: DD1.13 XP4.1 XP12.1 | length 28.3
  Top Layer w0.15: XP12.1 XP4.1 40.7,16.3 43.76,19.36 DD1.13
PWM5: DD1.16 XP5.1 XP13.1 | length 27.7
  Top Layer w0.15: DD1.16 45.26,19.34 46.8,17.8 XP5.1 XP13.1
PWM6: DD1.17 XP6.1 XP14.1 | length 30
  Top Layer w0.15: DD1.17 45.76,22.89 52.9,15.75 XP6.1 XP14.1
PWM7: DD1.18 XP7.1 XP15.1 | length 32.3
  Top Layer w0.15: DD1.18 46.26,26.29 59,13.55 XP7.1 XP15.1
PWM8: DD1.19 XP8.1 XP16.1 | length 36.3
  Top Layer w0.15: DD1.19 46.76,28.04 47.5,27.3 50.35,27.3 65.1,12.55 XP8.1 XP16.1
SWCLK: DD1.37 XS3.4 | length 53
  Top Layer w0.15: DD1.37 v1(49.9,39.45)
  Bottom Layer w0.25: v1(49.9,39.45) 49.9,32.9 68.9,13.9 86.954,13.9 87.009,13.844 87.486,13.844 XS3.4
SWDIO: DD1.34 XS3.3 | length 56.5
  Top Layer w0.15: v1(49,36.9) 49.025,36.925 50.735,36.925 DD1.34
  Top Layer w0.25: v1(81.562,12.437) 85.27,16.145 XS3.3
  Bottom Layer w0.25: v1(49,36.9) 49,31.05 68.75,11.3 80.462,11.3 v1@81.562,12.4
pads on no net: DD1.2 DD1.3 DD1.4 DD1.14 DD1.15 DD1.20 DD1.21 DD1.22 DD1.33 DD1.45 DD1.46

## Polygon pours and split planes (outlines as drawn)
GND on Top Layer "GND_L01_P003" (solid, pour order 3): 35,70 92,70 92,62 96,62 96,26 100,22 100,8 92,8 92,0 8,0 8,8 0,8 0,40 35,40
GND on Top Layer "GND_L01_P000" (solid, pour order 0): 0,62 8,62 8,70 34,70 34,41 0,41
GND on Bottom Layer "GND_L02_P002" (solid, pour order 2): 35,70 92,70 92,62 96,62 96,26 100,22 100,8 92,8 92,0 8,0 8,8 0,8 0,40 35,40
GND on Bottom Layer "GND_L02_P001" (solid, pour order 1): 0,62 8,62 8,70 34,70 34,41 0,41

## Other copper
Top Layer:
  pour cut-out: 41.6,40.2 51.4,40.2 51.4,30.3 41.6,30.3

## Silkscreen, mask and mechanical layers (free items; w line width, h text height)
Top Overlay:
  lines w0.5: 16.15,8.9 17.65,8.9 ; 16.65,47.4 18.15,47.4 ; 17.4,44.15 17.4,45.65 ; 17.4,46.65 17.4,48.15 ; 33.15,47.4 34.65,47.4 ; 33.9,44.15 33.9,45.65 ; 33.9,46.65 33.9,48.15 ; 67.9,8.9 69.4,8.9 ; 68.65,8.15 68.65,9.65
  lines w0.8: 4.4,48.9 6.4,48.9 ; 5.4,42.82 5.4,44.82 ; 5.4,47.9 5.4,49.9
  text "PANALED-board-v1.0" at 3.5,34.3 h1.5
  text "3V3" at 90.14,19.83 h1
  text "GND" at 90.14,17.29 h1
  text "SWDIO" at 90.14,14.75 h1
  text "SWCLK" at 90.14,12.21 h1
Board Shape:
  lines w0.1: 100,22 100,0 0,0 0,70 100,70 100,66 96,62 96,26 100,22 ; 100,22 100,22
Assembly Notes:
  lines w0.05: 86.3,0 86.3,22.4 100,22.4
  lines w0.1: 0,51.8 32,51.8 32,39.3 7,39.3 7,51.8 ; 8,51.8 8,70 ; 96,26 82.2,26 82.2,62 96,62 ; 100,0 18.4,0 18.4,12.3 ; 18.4,12.3 18.4,2.5 83.7,2.5 83.7,12.3 18.4,12.3 ; 86.3,12.3 89,12.3 89,22.4 86.3,22.4 86.3,12.3